# Altium PCB RC_Wheelchair.PcbDoc (part 1 of 2)
Units mil, origin at the board's own origin, x right, y up, seen from the top; angles counter-clockwise.
Board outline 6000 x 4000 mil, 2 copper layers (Top Layer, Bottom Layer); 99 components, 129 nets, 398 pads, 0 vias.
Unrouted connection lines stored in the file: 229.
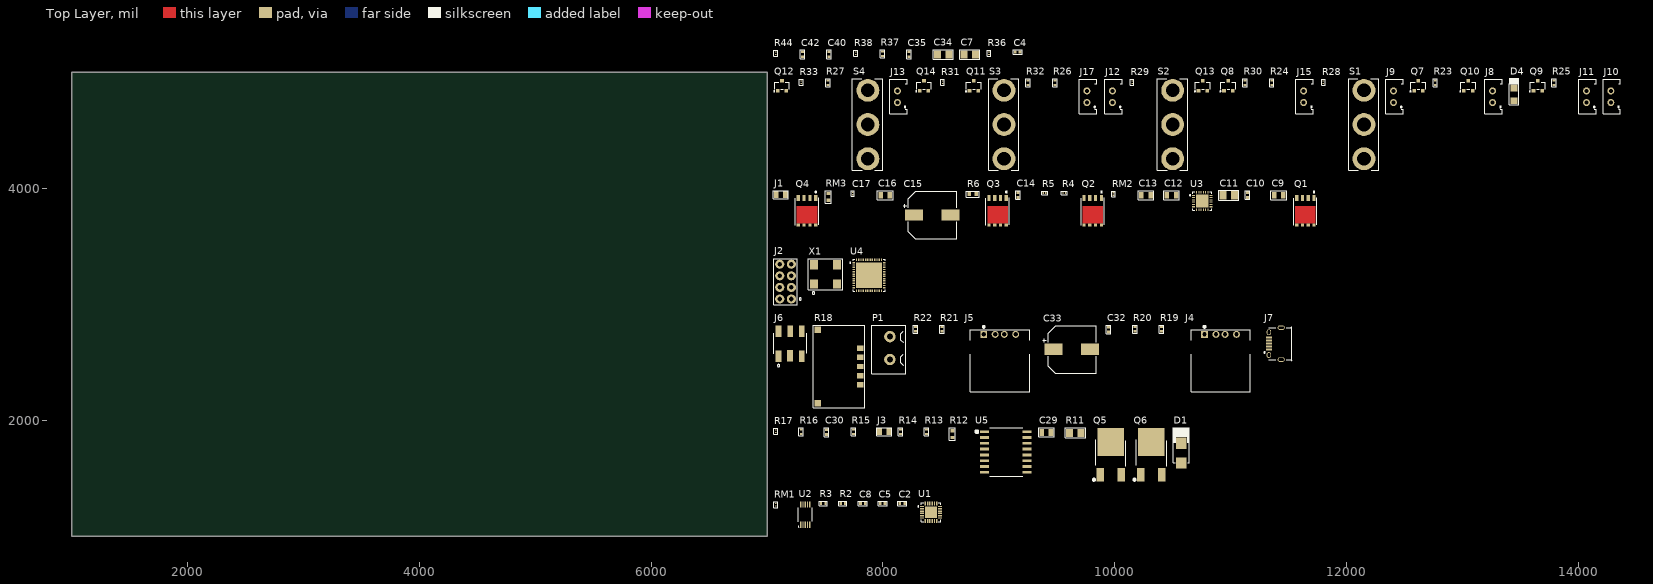
[diagram p0: Top Layer view]
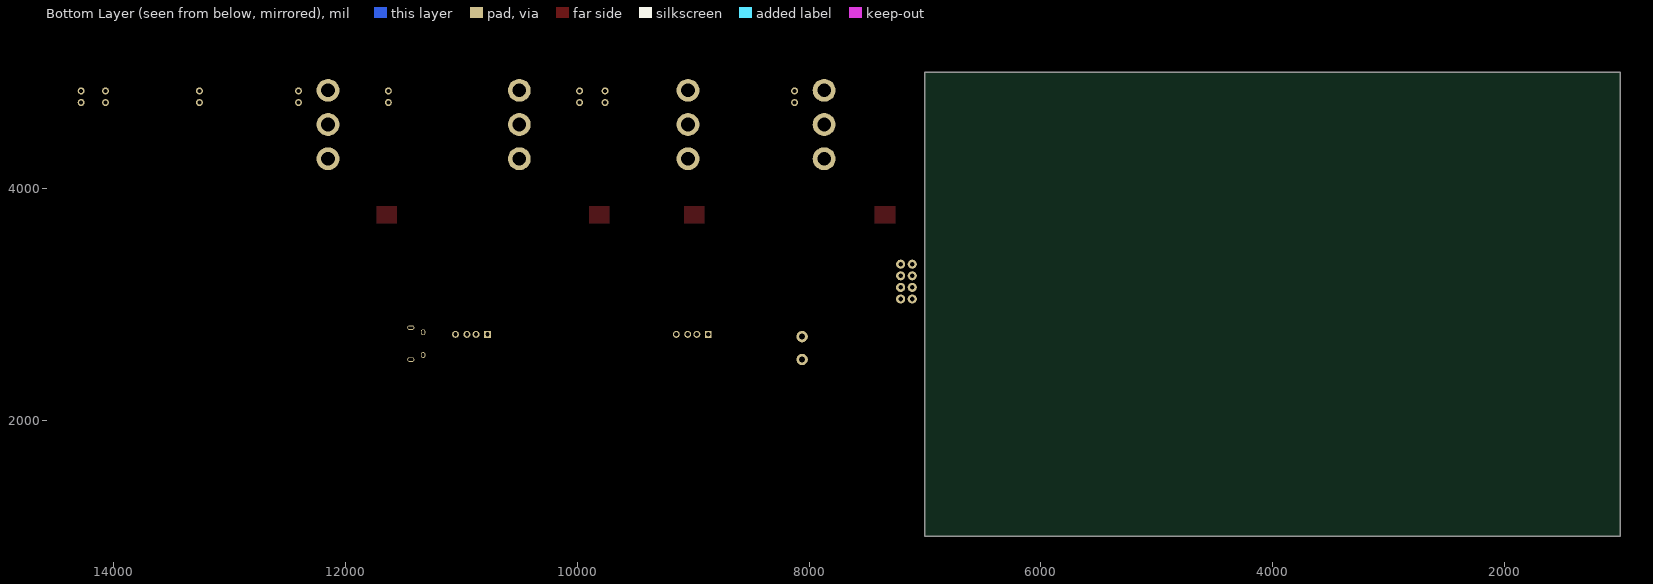
[diagram p1: Bottom Layer view, seen from below]

## Layer stack, top to bottom
Top Solder: solder mask 0.4, Solder Resist, Dk 3.5
Top Layer: signal copper 1.4
Dielectric 1: dielectric 12.6, FR-4, Dk 4.8
Bottom Layer: signal copper 1.4
Bottom Solder: solder mask 0.4, Solder Resist, Dk 3.5

## Board outline
1000,1000 7000,1000 7000,5000 1000,5000

## Design rules (kind name [scope] priority, off if disabled: settings)
Clearance [All] p1: gap=10 ignorepadtopadclearanceinfootprint=FALSE except(0: Arc-Hole Track-Hole SMDPad-Hole THPad-Hole Via-Hole Fill-Hole Poly-Hole Region-Hole Text-Hole)
PolygonConnect [All] p1: connectstyle=Relief reliefconductorwidth=10 reliefentries=4 polygonreliefangle="90 Angle" airgapwidth=10
RoomDefinition U_Power_Section [InComponentClass('U_Power_Section')] p1: confinementstyle=ConfineIn formatcopy=TRUE lockcomponents=FALSE outline 7045,5105 9250,5105 9250,5305 7045,5305
RoomDefinition U_Peripherals_Section [InComponentClass('U_Peripherals_Section')] p2: confinementstyle=ConfineIn formatcopy=TRUE lockcomponents=FALSE outline 7045,4140 14385,4140 14385,5055 7045,5055
RoomDefinition U_Drive_Motor_Section [InComponentClass('U_Drive_Motor_Section')] p3: confinementstyle=ConfineIn formatcopy=TRUE lockcomponents=FALSE outline 7045,3555 11755,3555 11755,4090 7045,4090
RoomDefinition "U_Controller Section" [InComponentClass('U_Controller Section')] p4: confinementstyle=ConfineIn formatcopy=TRUE lockcomponents=FALSE outline 7045,2985 8035,2985 8035,3505 7045,3505
RoomDefinition U_Connector_Section [InComponentClass('U_Connector_Section')] p5: confinementstyle=ConfineIn formatcopy=TRUE lockcomponents=FALSE outline 7045,2095 11550,2095 11550,2930 7045,2930
RoomDefinition "U_Charging Section" [InComponentClass('U_Charging Section')] p6: confinementstyle=ConfineIn formatcopy=TRUE lockcomponents=FALSE outline 7045,1460 10655,1460 10655,2045 7045,2045
RoomDefinition U_Camera_Interface [InComponentClass('U_Camera_Interface')] p7: confinementstyle=ConfineIn formatcopy=TRUE lockcomponents=FALSE outline 7045,1060 8520,1060 8520,1410 7045,1410
RoutingVias [All] p1: holewidth=28 width=50 viastyle="Through Hole" minholewidth=28 minwidth=50 maxholewidth=28 maxwidth=50
SolderMaskExpansion [All] p1: expansion=4 istentingtop=FALSE
Width [All] p1: maxlimit=10 minlimit=10 preferedwidth=10
30 further rules are at their usual default settings.

## Classes and differential pairs
component class U_Power_Section: C4 C7 C34 C35 C36 C37 C38 C39 C40 C41 C42 L1 L2 R34 R35 R36 R37 R38 R39 R40 R41 R42 R43 R44 U6 U7 U8
component class U_Peripherals_Section: D4 J8 J9 J10 J11 J12 J13 J14 J15 J16 J17 J18 J19 Q7 Q8 Q9 Q10 Q11 Q12 Q13 Q14 R23 R24 R25 R26 R27 R28 R29 R30 R31 R32 R33 S1 S2 S3 S4
component class U_Drive_Motor_Section: C9 C10 C11 C12 C13 C14 C15 C16 C17 J1 Q1 Q2 Q3 Q4 R4 R5 R6 RM2 RM3 U3
component class "U_Controller Section": C18 C19 C20 C21 C22 C23 C24 C25 C26 C27 C28 J2 LED1 R7 R8 R9 R10 SW1 SW2 U4 X1
component class U_Connector_Section: C31 C32 C33 D2 D3 J4 J5 J6 J7 P1 R18 R19 R20 R21 R22 RF1 RF2
component class "U_Charging Section": C29 C30 D1 J3 Q5 Q6 R11 R12 R13 R14 R15 R16 R17 U5
component class U_Camera_Interface: C1 C2 C3 C5 C6 C8 R1 R2 R3 RM1 U1 U2

## Components (designator, comment, footprint, x,y, rotation, side; value= is the part's Value field where it differs from the comment)
C2 "0.1uF" "CAP 0402" 8145,1280 r0 top
C4 "0.1uF" "CAP 0402" 9140,5175 r0 top
C5 "0.1uF" "CAP 0402" 7975,1280 r0 top
C7 "10uF" Cap1206 8750,5155 r0 top
C8 "0.1uF" "CAP 0402" 7805,1280 r0 top
C9 "1UF" Cap0805 11415,3940 r0 top
C10 "0.1uF" "CAP 0402" 11145,3920 r90 top
C11 "10UF" Cap1206 10985,3940 r0 top
C12 "1UF" Cap0805 10490,3940 r0 top
C13 "1UF" Cap0805 10270,3940 r0 top
C14 "0.1uF" "CAP 0402" 9165,3920 r90 top
C15 "470µF" UCD1V471MNL6GS 8425,3770 r0 top
C16 "1UF" Cap0805 8020,3940 r0 top
C17 "1nF" "CAP 0201" 7740,3955 r90 top
C29 "1UF" Cap0805 9410,1895 r0 top
C30 "0.1UF" "CAP 0402" 7515,1875 r90 top
C32 "0.1uF" "CAP 0402" 9945,2760 r90 top
C33 "470µF" UCD1V471MNL6GS 9630,2610 r0 top
C34 "10uF" Cap1206 8520,5155 r0 top
C35 "0.1uF" "CAP 0402" 8225,5135 r90 top
C40 "0.1uF" "CAP 0402" 7535,5135 r90 top
C42 "0.1uF" "CAP 0402" 7305,5135 r90 top
D1 "ES3AB-13-F" ES3AB-13-F 10575,1715 r90 top
D4 "PMEG3010ER,115" SOD-123W 13445,4810 r90 top
J1 "SMD PADS" "SMD PAD" 7120,3945 r0 top
J2 "MTF185-204SY1" MTF185-204SY1 7210,3045 r90 top
J3 "SMD PADS" "SMD PAD" 8010,1900 r0 top
J4 "292303-1" 292303-1 10775,2740 r0 top
J5 "292303-1" 292303-1 8870,2740 r0 top
J6 "95278-101A06LF" 95278-101A06LF 7200,2660 r0 top
J7 "10118194-0001LF" 10118194-0001LF 11330,2660 r90 top
J8 "B2B-EH-A(LF)(SN)" B2B-EH-A(LF)(SN) 13260,4790 r90 top
J9 "B2B-EH-A(LF)(SN)" B2B-EH-A(LF)(SN) 12405,4790 r90 top
J10 "B2B-EH-A(LF)(SN)" B2B-EH-A(LF)(SN) 14280,4790 r90 top
J11 "B2B-EH-A(LF)(SN)" B2B-EH-A(LF)(SN) 14070,4790 r90 top
J12 "B2B-EH-A(LF)(SN)" B2B-EH-A(LF)(SN) 9980,4790 r90 top
J13 "B2B-EH-A(LF)(SN)" B2B-EH-A(LF)(SN) 8125,4790 r90 top
J15 "B2B-EH-A(LF)(SN)" B2B-EH-A(LF)(SN) 11630,4790 r90 top
J17 "B2B-EH-A(LF)(SN)" B2B-EH-A(LF)(SN) 9760,4790 r90 top
P1 "WJ301V-5.0-2P" WJ301V-5.0-2P 8060,2720 r90 top value=Custom
Q1 "CSD18540Q5B" 8-VSON-CLIP 11645,3800 r90 top
Q2 "CSD18540Q5B" 8-VSON-CLIP 9810,3800 r90 top
Q3 "CSD18540Q5B" 8-VSON-CLIP 8990,3800 r90 top
Q4 "CSD18540Q5B" 8-VSON-CLIP 7345,3800 r90 top
Q5 "MJD32CT4G" DPAK 9965,1670 r0 top
Q6 "MJD31CT4G" DPAK 10315,1670 r0 top
Q7 "DMP6350S-7" SOT23-3 12620,4885 r0 top
Q8 "DMP6350S-7" SOT23-3 10980,4885 r0 top
Q9 "DMP6350S-7" SOT23-3 13650,4885 r0 top
Q10 "DMP6350S-7" SOT23-3 13050,4885 r0 top
Q11 "DMP6350S-7" SOT23-3 8785,4885 r0 top
Q12 "DMP6350S-7" SOT23-3 7130,4885 r0 top
Q13 "DMP6350S-7" SOT23-3 10760,4885 r0 top
Q14 "DMP6350S-7" SOT23-3 8355,4885 r0 top
R2 "22.6K" Res0402 7655,1280 r0 top
R3 "47K" Res0402 7485,1280 r0 top
R4 "10K" Res-0201 9565,3960 r0 top
R5 "10K" Res-0201 9395,3960 r0 top
R6 "68K" Res0603 8775,3950 r0 top
R11 "0.082R" Res1206 9660,1890 r0 top
R12 "162K" Res0603 8600,1880 r90 top
R13 "16.9K" Res0402 8375,1900 r90 top
R14 "46.4K" Res0402 8150,1900 r90 top
R15 "475K" Res0402 7745,1900 r90 top
R16 "442R" Res0402 7295,1900 r90 top
R17 "10K" Res-0201 7075,1905 r90 top
R18 "10K" RK14J11R000J 7805,2305 r90 top
R19 "0R" Res0402 10405,2785 r90 top
R20 "0R" Res0402 10175,2785 r90 top
R21 "0R" Res0402 8510,2785 r90 top
R22 "0R" Res0402 8280,2785 r90 top
R23 "68R" Res0402 12765,4910 r90 top
R24 "68R" Res0402 11355,4910 r90 top
R25 "48.7R" Res0402 13790,4910 r90 top
R26 "68R" Res0402 9485,4910 r90 top
R27 "68R" Res0402 7525,4910 r90 top
R28 "10K" Res-0201 11800,4915 r90 top
R29 "10K" Res-0201 10150,4915 r90 top
R30 "240R" Res0402 11125,4910 r90 top
R31 "10K" Res-0201 8515,4915 r90 top
R32 "240R" Res0402 9250,4910 r90 top
R33 "10K" Res-0201 7295,4915 r90 top
R36 "10K" Res-0201 8915,5165 r90 top
R37 "47K" Res0402 7995,5160 r90 top
R38 "10K" Res-0201 7765,5165 r90 top
R44 "10K" Res-0201 7075,5165 r90 top
RM1 "10K" Res-0201 7075,1270 r90 top
RM2 "10K" Res-0201 9990,3950 r90 top
RM3 "0.01R" Res0603 7530,3925 r90 top
S1 "DC1C-A1AA" DC1C-A1AA 12150,4550 r90 top
S2 "DC1C-A1AA" DC1C-A1AA 10500,4550 r90 top
S3 "DC1C-A1AA" DC1C-A1AA 9045,4550 r90 top
S4 "DC1C-A1AA" DC1C-A1AA 7870,4550 r90 top
U1 "CP2102N-A02-GQFN24R" "24-QFN (4x4)" 8415,1205 r0 top
U2 "FSUSB30MUX" 10-MSOP 7330,1185 r90 top
U3 "DRV8701ERGET" DRV8701ERGET 10755,3890 r0 top
U4 "STM32F401CCU6" 48-UFQFPN 7880,3250 r0 top
U5 "BQ24450DWTR" 16-SOIC 9060,1725 r0 top
X1 "X1G004481000200" X1G004481000200 7405,3175 r0 top

## Footprints (in the part's own frame and the unit in brackets; to place one, negate y for a bottom-side part, rotate by r counter-clockwise, add the part's x,y. Pads: shape width x height; smd on the part's side, far side on the other; paste and mask are expansions set on the pad)
8-VSON-CLIP [mm] "MOSFET N-CH 60V 100A 8VSON"
  rect 1.372x0.71 smd: 1(2.966,-1.905) 2(2.966,-0.635) 3(2.966,0.635) 4(2.966,1.905) 4(2.966,1.905) 4(2.966,1.905) 4(2.966,1.905)
  rect 0.59x0.71 smd: 5(-2.965,1.905) 6(-2.965,0.635) 7(-2.965,-0.635) 8(-2.965,-1.905)
  Top Layer region: -2.666,-2.262 1.182,-2.262 1.182,2.261 -2.666,2.261
  silkscreen extent -2.97,-2.54 4.46,2.56, body extent -3,-2.5 3,2.5, height 1.05
10-MSOP [mm] "IC USB SWITCH 2X2 10MSOP"
  rect 1.4x0.3 smd: 1(-2.2,1) 2(-2.2,0.5) 3(-2.2,0) 4(-2.2,-0.5) 5(-2.2,-1) 6(2.2,-1) 7(2.2,-0.5) 8(2.2,0) 9(2.2,0.5) 10(2.2,1)
  silkscreen extent -2.72,-1.55 1.52,1.55, body extent -2.45,-1.5 2.45,1.5, height 1.25
16-SOIC [mm] "IC BATTERY CHARGER CTRLR 16-SOIC"
  rect 2x0.6 smd: 1(-4.65,4.445) 2(-4.65,3.175) 3(-4.65,1.905) 4(-4.65,0.635) 5(-4.65,-0.635) 6(-4.65,-1.905) 7(-4.65,-3.175) 8(-4.65,-4.445) 9(4.65,-4.445) 10(4.65,-3.175) 11(4.65,-1.905) 12(4.65,-0.635) 13(4.65,0.635) 14(4.65,1.905) 15(4.65,3.175) 16(4.65,4.445)
  silkscreen extent -6.63,-5.33 3.75,5.33, body extent -5.32,-5.24 5.32,5.25, height 2.64
"24-QFN (4x4)" [mm]
  rect 0.85x0.3 smd: 1(-1.95,1.25) 2(-1.95,0.75) 3(-1.95,0.25) 4(-1.95,-0.25) 5(-1.95,-0.75) 6(-1.95,-1.25) 13(1.95,-1.25) 14(1.95,-0.75) 15(1.95,-0.25) 16(1.95,0.25) 17(1.95,0.75) 18(1.95,1.25)
  rect 0.3x0.85 smd: 7(-1.25,-1.95) 8(-0.75,-1.95) 9(-0.25,-1.95) 10(0.25,-1.95) 11(0.75,-1.95) 12(1.25,-1.95) 19(1.25,1.95) 20(0.75,1.95) 21(0.25,1.95) 22(-0.25,1.95) 23(-0.75,1.95) 24(-1.25,1.95)
  rect 2.55x2.55 smd: 25(0,0)
  silkscreen extent -2.92,-2.11 2.11,2.11, body extent -2.01,-2.01 2.01,2.01, height 0.9
48-UFQFPN [mm] "IC MCU 32BIT 256KB FLASH 48QFPN"
  rect 0.55x0.3 smd: 1(-3.35,2.75) 1(-3.35,2.75) 2(-3.35,2.25) 3(-3.35,1.75) 4(-3.35,1.25) 5(-3.35,0.75) 6(-3.35,0.25) 7(-3.35,-0.25) 8(-3.35,-0.75) 9(-3.35,-1.25) 10(-3.35,-1.75) 11(-3.35,-2.25) 12(-3.35,-2.75) 25(3.35,-2.75) 26(3.35,-2.25) 27(3.35,-1.75) 28(3.35,-1.25) 29(3.35,-0.75) 30(3.35,-0.25) 31(3.35,0.25) 32(3.35,0.75) 33(3.35,1.25) 34(3.35,1.75) 35(3.35,2.25) 36(3.35,2.75)
  rect 0.3x0.55 smd: 13(-2.75,-3.35) 14(-2.25,-3.35) 15(-1.75,-3.35) 16(-1.25,-3.35) 17(-0.75,-3.35) 18(-0.25,-3.35) 19(0.25,-3.35) 20(0.75,-3.35) 21(1.25,-3.35) 22(1.75,-3.35) 23(2.25,-3.35) 24(2.75,-3.35) 37(2.75,3.35) 38(2.25,3.35) 39(1.75,3.35) 40(1.25,3.35) 41(0.75,3.35) 42(0.25,3.35) 43(-0.25,3.35) 44(-0.75,3.35) 45(-1.25,3.35) 46(-1.75,3.35) 47(-2.25,3.35) 48(-2.75,3.35)
  rect 5.6x5.6 smd: 49(0,0)
  silkscreen extent -4.2,-3.53 3.51,3.53, body extent -3.5,-3.5 3.5,3.5, height 0.55
95278-101A06LF [mm] "CONN HEADER SMD 6POS 2.54MM"
  rect 1.27x2.54 smd: 1(-2.54,-2.73) 2(-2.54,2.73) 3(-0.025,-2.692) 4(0,2.73) 5(2.54,-2.73) 6(2.54,2.73)
  silkscreen extent -3.56,-5.08 3.66,2.29, body extent -3.58,-3.63 3.64,3.67, height 9.72
292303-1 [mm] "USB-A (USB TYPE-A) USB 2.0 Receptacle Connector 4 Position Through Hole, Right Angle"
  rect 1.524x1.524 hole 0.92: 1(0,0)
  round 1.524 hole 0.92: 2(2.5,0) 3(4.5,0) 4(7,0)
  round 0 hole 2.3 unplated: MH1(-3.07,-2.71) MH2(10.07,-2.71)
  silkscreen extent -2.92,-12.57 10.03,1.83, body extent -4.44,-13.02 11.56,0.98, height 7.71
10118194-0001LF [mm]
  rect 0.42x1.35 smd: 1(-1.3,0) 2(-0.65,0) 3(0,0) 4(0.65,0) 5(1.3,0)
  oval 1.25x1 hole 0.55 slot 0.85 at 0 deg: MH1(-2.5,0) MH2(2.5,0)
  oval 1x1.55 hole 0.5 slot 1.15 at 90 deg: MH3(-3.5,-2.7) MH4(3.5,-2.7)
  silkscreen extent -3.73,-5 3.72,1.1, body extent -7.67,-5.38 4.02,0.2, height 2.72
B2B-EH-A(LF)(SN) [mil]
  round 60 hole 35.43: 1(-50,0) 2(50,0)
  silkscreen extent -148,-83 151,67, body extent -148,-86 148,64, height 244
Cap0805 [mil] "SMD 0805"
  rect 40x60 smd: 1(-40,0) 2(40,0)
  silkscreen extent -67,-37 67,37, body extent -39,-25 39,25, height 30
Cap1206 [mil] "SMD 1206"
  rect 60x70 smd: 1(-50,0) 2(50,0)
  silkscreen extent -87,-42 87,42, body extent -63,-31 63,32, height 39
"CAP 0201" [mm]
  rect 0.3x0.3 smd: 1(-0.3,0) 2(0.3,0)
  silkscreen extent -0.6,-0.3 0.61,0.3, body extent -0.3,-0.15 0.3,0.15, height 0.28
"CAP 0402" [mm] "CC0402JRNPO9BN330"
  rect 0.6x0.7 smd: 1(0.025,0) 2(1.085,0)
  silkscreen extent -0.42,-0.5 1.54,0.48, body extent -0.01,-0.29 1.11,0.32, height 0.56
DC1C-A1AA [mm]
  round 5 hole 3: 1(-7.5,0) 2(0,0) 3(7.5,0)
  silkscreen extent -10.06,-3.28 9.98,3.38, body extent -9.95,-3.17 9.9,3.28, height 12.01
DPAK [mm] "TRANS PNP 100V 3A DPAK"
  rect 1.6x3 smd: 1(-2.285,-3.59) 3(2.285,-3.59)
  rect 5.8x6.2 smd: 2_4(0.007,3.59)
  silkscreen extent -3.86,-4.88 3.35,4.06, body extent -3.27,-4.29 3.27,5.65, height 2.39
DRV8701ERGET [mm] "Motor Driver Power MOSFET Parallel 24-VQFN (4x4)"
  rect 0.6x0.24 smd: 1(-1.9,1.25) 2(-1.9,0.75) 3(-1.9,0.25) 4(-1.9,-0.25) 5(-1.9,-0.75) 6(-1.9,-1.25) 13(1.9,-1.25) 14(1.9,-0.75) 15(1.9,-0.25) 16(1.9,0.25) 17(1.9,0.75) 18(1.9,1.25)
  rect 0.24x0.6 smd: 7(-1.25,-1.9) 8(-0.75,-1.9) 9(-0.25,-1.9) 10(0.25,-1.9) 11(0.75,-1.9) 12(1.25,-1.9) 19(1.25,1.9) 20(0.75,1.9) 21(0.25,1.9) 22(-0.25,1.9) 23(-0.75,1.9) 24(-1.25,1.9)
  rect 2.8x2.8 smd: 25(0,0)
  silkscreen extent -2.79,-2.03 2.03,2.03, body extent -2,-2 2,2, height 0.9
ES3AB-13-F [mm] "DIODE GEN PURP 50V 3A SMB"
  rect 2.5x2.3 smd: 1(-2.15,0) 2(2.15,0)
  silkscreen extent -2.11,-1.78 5.59,1.78, body extent -2.7,-1.8 2.7,1.8, height 2.3
MTF185-204SY1 [mm] "Female Header Female Socket 0.100\"(2.54mm) 8 2 Through Hole"
  round 2 hole 1.02: 1(0,0) 2(0,2.54) 3(2.54,0) 4(2.54,2.54) 5(5.08,0) 6(5.08,2.54) 7(7.62,0) 8(7.62,2.54)
  silkscreen extent -1.27,-2.22 8.86,3.84
Res0402 [mil]
  rect 18x25 smd: 1(-18.5,0) 2(18.5,0)
  silkscreen extent -34,-19 34,19, body extent -23,-11 23,11, height 16
Res0603 [mil]
  rect 30x35 smd: 1(30,0) 2(-30,0)
  silkscreen extent -54,-26 54,26, body extent -31,-17 31,17, height 18
Res1206 [mil]
  rect 60x70 smd: 1(-50,0) 2(50,0)
  silkscreen extent -88,-43 88,43, body extent -63,-31 63,32, height 39
Res-0201 [mm]
  rect 0.27x0.37 smd: 1(-0.275,0) 2(0.275,0)
  silkscreen extent -0.64,-0.41 0.64,0.41, body extent -0.3,-0.15 0.3,0.15, height 0.29
RK14J11R000J [mm] "10K ±30% SMD Potentiometers & Variable Resistors RoHS"
  rect 1.2x1.4 smd: 1(0,0) 2(6,0) 3(2,0) D1(4,0) D2(8,0)
  rect 0x0 hole 1 square unplated: MH1(-2.8,7.5) MH2(10,7.5)
  rect 1.5x1.4 smd: MP1(-4.05,9.3) MP2(12.05,9.3)
  silkscreen extent -5.05,-0.97 13.06,10.26
"SMD PAD" [mil] "SMD 0805"
  rect 40x60 smd: 1(-40,0) 2(40,0)
  silkscreen extent -65,-35 65,35
SOD-123W [mm] "DIODE SCHOTTKY 30V 1A SOD123W"
  rect 1.5x1.5 smd: 1(-1.4,0) 2(1.4,0)
  silkscreen extent -2.31,-1.09 3.55,1.09, body extent -2,-0.95 2,0.95, height 1.1
SOT23-3 [mm] "SOT23, 3-Leads, Body 2.9x1.3mm, Pitch 0.95mm, Lead Span 2.3mm - Reverse Pinning, IPC High Density"
  rect 0.8x0.8 smd: 1(-0.95,-1.075) 2(0.95,-1.075) 3(0,1.075)
  silkscreen extent -1.85,-1.37 1.63,0.81, body extent -1.5,-1.25 1.5,1.25, height 1.05
UCD1V471MNL6GS [mm] "470µF 35V Aluminum Electrolytic Capacitors Radial, Can - SMD  5000 Hrs @ 105°C"
  rect 4x2.5 smd: 1(-4,0) 2(4,0)
  silkscreen extent -6.38,-5.21 5.33,5.21, body extent -5.65,-5.16 5.65,5.16, height 14.05
WJ301V-5.0-2P [mm]
  round 2.5 hole 1.3: 1(-5,0) 2(0,0)
  silkscreen extent -8.07,-3.5 2.5,3.99, body extent -8.1,-3.5 2.5,4, height 10
X1G004481000200 [mm] "24MHz ±100ppm 1.6V ~ 3.6V 3mA SMD-7050_4P SMD Oscillators(XO) RoHS"
  rect 1.8x2 smd: 1(0,0) 2(5.08,0) 3(5.08,4.2) 4(0,4.2)
  silkscreen extent -1.24,-2.3 6.35,5.49

## Part data
C2 C5 C8 C10 C14 C32: library part CC0402KRX7R7BB104, "CAP CER 0.1UF 16V X7R 0402", Capacitance=100nF, Case/Package=0402, Case Code (Metric)=1005, Dielectric=X7R, Manufacturer=Yageo, Max Operating Temperature=125°C, Min Operating Temperature=-55°C, Package Quantity=1, Supplier Part Number 1=311-1338-1-ND, Tolerance=10%, Voltage=16V, Case Code (Imperial)=0402, ComponentLink1Description=http://www.yageo.com/documents/recent/UPY-GPHC_X7R_6.3V-to-50V_8.pdf?src-supplier=Avnet+Europe, ComponentLink1URL=http://www.yageo.com/documents/recent/UPY-GPHC_X7R_6.3V-to-50V_8.pdf?src-supplier=Avnet+Europe, ComponentLink2Description=http://www.yageo.com/documents/recent/UPY-GPHC_X7R_6.3V-to-50V_18.pdf?src-supplier=Digi-Key, ComponentLink2URL=http://www.yageo.com/documents/recent/UPY-GPHC_X7R_6.3V-to-50V_18.pdf?src-supplier=Digi-Key, ComponentLink3Description=http://www.yageo.com/documents/recent/UPY-GPHC_X7R_6.3V-to-50V_8.pdf?src-supplier=Avnet, ComponentLink3URL=http://www.yageo.com/documents/recent/UPY-GPHC_X7R_6.3V-to-50V_8.pdf?src-supplier=Avnet, ComponentLink4Description=http://www.yageo.com/documents/recent/UPY-GPHC_X7R_6.3V-to-50V_18.pdf?src-supplier=Mouser, ComponentLink4URL=http://www.yageo.com/documents/recent/UPY-GPHC_X7R_6.3V-to-50V_18.pdf?src-supplier=Mouser, ComponentLink5Description=http://www.farnell.com/datasheets/2167236.pdf?src-supplier=Element14, ComponentLink5URL=http://www.farnell.com/datasheets/2167236.pdf?src-supplier=Element14, ComponentLink6Description=http://www.farnell.com/datasheets/1489800.pdf?src-supplier=Element14, ComponentLink6URL=http://www.farnell.com/datasheets/1489800.pdf?src-supplier=Element14, Composition=Ceramic, Depth=0.5mm, Halogen Free="Halogen Free", Height=0.5mm, Lead Free="Lead Free", Length=1mm, Manufacturer Part Number=CC0402KRX7R7BB104, Mount="Surface Mount", Number of Pins=2, Packaging="Tape and Reel", Pricing 1="1=0.1, 10=0.034, 100=0.015, 500=0.0107, 1000=0.00841, 2500=0.00764, 5000=0.00703 (USD)", Radiation Hardening=No, REACH SVHC="No SVHC", Stock 1=9987374, Supplier 1=Digi-Key, Termination=SMD/SMT, Thickness=0.022inch, Voltage Rating=16V, Voltage Rating (DC)=16V, Width=0.02inch
C4 C35 C40 C42: library part CL05B104KB54PNC, "CAP CER 0.1UF 50V X7R 0402", Manufacturer=Samsung, Supplier Part Number 1=1276-CL05B104KB54PNCDKR-ND, Manufacturer Part Number=CL05B104KB54PNC, Pricing 1="1=0.1, 10=0.067, 50=0.0366, 100=0.0299, 500=0.02138, 1000=0.01681, 2500=0.01528, 5000=0.01406 (USD)", Stock 1=8594, Supplier 1=Digi-Key
C7 C34: library part CL31B106KBHNNNE, "CAP CER 10UF 50V X7R 1206", Case/Package=1206, Case Code (Metric)=3216, Dielectric=X7R, Manufacturer=Samsung, Max Operating Temperature=125°C, Min Operating Temperature=-55°C, Supplier Part Number 1=1276-6767-1-ND, Tolerance=10%, Voltage Rating=50V, Capacitance=10uF, Case Code (Imperial)=1206, ComponentLink1Description=http://www.samsungsem.com/kr/support/product-search/mlcc/CL31B106KBHNNNE.jsp?src-supplier=Digi-Key, ComponentLink1URL=http://www.samsungsem.com/kr/support/product-search/mlcc/CL31B106KBHNNNE.jsp?src-supplier=Digi-Key, Lead Free="Lead Free", Length=0.126inch, Manufacturer Part Number=CL31B106KBHNNNE, Mount="Surface Mount", Packaging="Tape and Reel", Pricing 1="1=0.39, 10=0.268, 50=0.1872, 100=0.1605, 500=0.12038, 1000=0.10166 (USD)", Stock 1=177239, Supplier 1=Digi-Key, Thickness=0.071inch, Voltage Rating (DC)=50V, Width=0.063inch
C9 C12 C13 C16 C29: library part CL21B105KBFNNNE, "CAP CER 1UF 50V X7R 0805", Capacitance=1uF, Case/Package=0805, Case Code (Metric)=2012, Dielectric=X7R, Manufacturer=Samsung, Max Operating Temperature=125°C, Min Operating Temperature=-55°C, Package Quantity=1, Supplier Part Number 1=1276-1029-1-ND, Tolerance=10%, Voltage=50V, Case Code (Imperial)=0805, ComponentLink1Description=http://www.samsungsem.com/kr/support/product-search/mlcc/CL21B105KBFNNNE.jsp?src-supplier=Digi-Key, ComponentLink1URL=http://www.samsungsem.com/kr/support/product-search/mlcc/CL21B105KBFNNNE.jsp?src-supplier=Digi-Key, ComponentLink2Description=http://www1.futureelectronics.com/doc/SAMSUNG/CL21B105KBFNNNE.pdf?src-supplier=Future+Electronics, ComponentLink2URL=http://www1.futureelectronics.com/doc/SAMSUNG/CL21B105KBFNNNE.pdf?src-supplier=Future+Electronics, ComponentLink3Description=https://www.verical.com/server-webapp/html/getDatasheet?partID=354075&src-supplier=Verical, ComponentLink3URL=https://www.verical.com/server-webapp/html/getDatasheet?partID=354075&src-supplier=Verical, Depth=1.25mm, Height=1.25mm, Length=2mm, Manufacturer Part Number=CL21B105KBFNNNE, Mount="Surface Mount", Packaging="Tape and Reel", Pricing 1="1=0.13, 10=0.093, 50=0.053, 100=0.0439, 500=0.03076, 1000=0.02547 (USD)", Radiation Hardening=No, Stock 1=550461, Supplier 1=Digi-Key, Thickness=0.053inch, Voltage Rating=50V, Width=0.049inch
C11: library part CL31B106KBHNNNE, "CAP CER 10UF 50V X7R 1206", Capacitance=10uF, Case/Package=1206, Case Code (Metric)=3216, Dielectric=X7R, Manufacturer=Samsung, Max Operating Temperature=125°C, Min Operating Temperature=-55°C, Supplier Part Number 1=1276-6767-1-ND, Tolerance=10%, Voltage Rating=50V, Case Code (Imperial)=1206, ComponentLink1Description=http://www.samsungsem.com/kr/support/product-search/mlcc/CL31B106KBHNNNE.jsp?src-supplier=Digi-Key, ComponentLink1URL=http://www.samsungsem.com/kr/support/product-search/mlcc/CL31B106KBHNNNE.jsp?src-supplier=Digi-Key, Lead Free="Lead Free", Length=0.126inch, Manufacturer Part Number=CL31B106KBHNNNE, Mount="Surface Mount", Packaging="Tape and Reel", Pricing 1="1=0.39, 10=0.268, 50=0.1872, 100=0.1605, 500=0.12038, 1000=0.10166 (USD)", Stock 1=177239, Supplier 1=Digi-Key, Thickness=0.071inch, Voltage Rating (DC)=50V, Width=0.063inch
C15 C33: library part UCD1V471MNL6GS, "470µF 35V Aluminum Electrolytic Capacitors Radial, Can - SMD", Capacitance=470uF, Case/Package=Aluminum, Leakage Current=3uA, Manufacturer=Nichicon, Max Operating Temperature=105°C, Min Operating Temperature=-55°C, Package Quantity=400, Ripple Current=950mA, Supplier Part Number 1=493-14715-6-ND, Tolerance=20%, Voltage Rating (DC)=35V, ComponentLink1Description=http://www.mouser.com/ds/2/293/e-ucd-883803.pdf?src-supplier=Mouser, ComponentLink1URL=http://www.mouser.com/ds/2/293/e-ucd-883803.pdf?src-supplier=Mouser, ComponentLink2Description=http://nichicon-us.com/english/products/pdfs/e-ucd.pdf?src-supplier=Digi-Key, ComponentLink2URL=http://nichicon-us.com/english/products/pdfs/e-ucd.pdf?src-supplier=Digi-Key, Length=13.5mm, Manufacturer Part Number=UCD1V471MNL6GS, Packaging="Tape and Reel", Pricing 1="1=1.04, 10=0.789, 50=0.6556, 100=0.5646 (USD)", Stock 1=2530, Supplier 1=Digi-Key, Termination=SMD/SMT
C17: library part 0201B102K160CT, "CAP CER 1000PF 16V X7R 0201", Case/Package=0201, Case Code (Metric)=0603, Dielectric=X7R, Manufacturer="Walsin Technologies", Max Operating Temperature=125°C, Min Operating Temperature=-55°C, Supplier Part Number 1=1292-1117-6-ND, Tolerance=10%, Voltage Rating=16V, Capacitance=1nF, Case Code (Imperial)=0201, Manufacturer Part Number=0201B102K160CT, Packaging="Cut Tape", Pricing 1="1=0.1, 10=0.015, 50=0.0084, 100=0.0068, 500=0.00488, 1000=0.00384, 2500=0.00349, 5000=0.00321 (USD)", REACH SVHC=Unknown, Stock 1=360567, Supplier 1=Digi-Key, Voltage Rating (DC)=16V
C30: library part C0402C104Z4VAC7867, "0.1µF -20%, +80% 16V Ceramic Capacitor Y5V (F) 0402 (1005 Metric)", Capacitance=100nF, Case/Package=0402, Dielectric=Y5V, Dielectric Material=Ceramic, Manufacturer=KEMET, Manufacturer Part Number=C0402C104Z4VACTU, Max Operating Temperature=85°C, Min Operating Temperature=-30°C, Supplier Part Number 1=399-1043-6-ND, Tolerance=80%, Voltage Rating (DC)=16V, ComponentLink1Description=https://www.verical.com/server-webapp/html/getDatasheet?partID=764272&src-supplier=Verical, ComponentLink1URL=https://www.verical.com/server-webapp/html/getDatasheet?partID=764272&src-supplier=Verical, Depth=0.5mm, Height=0.5mm, Lead Free="Lead Free", Length=1mm, Mount="Surface Mount", Packaging="Tape and Reel", Pricing 1="1=0.1, 10=0.018, 100=0.0081, 500=0.00578, 1000=0.00454, 2500=0.00412, 5000=0.0038 (USD)", Radiation Hardening=No, Stock 1=1342942, Supplier 1=Digi-Key
D1: "DIODE GEN PURP 50V 3A SMB", Average Rectified Current=3A, Capacitance=45pF, Case/Package=SMB, Forward Voltage=900mV, Manufacturer=Diodes, Max Operating Temperature=150°C, Max Repetitive Reverse Voltage (Vrrm)=50V, Max Surge Current=100A, Min Operating Temperature=-55°C, Package Quantity=3000, Peak Reverse Current=10uA, Supplier Part Number 1=ES3AB-FDIDKR-ND, ComponentLink1Description=http://www.diodes.com///datasheets/ds14003.pdf?src-supplier=Avnet+Europe, ComponentLink1URL=http://www.diodes.com///datasheets/ds14003.pdf?src-supplier=Avnet+Europe, ComponentLink2Description=http://www.diodes.com///datasheets/ds14003.pdf?src-supplier=Avnet, ComponentLink2URL=http://www.diodes.com///datasheets/ds14003.pdf?src-supplier=Avnet, ComponentLink3Description=https://www.verical.com/server-webapp/html/getDatasheet?partID=61156&src-supplier=Verical, ComponentLink3URL=https://www.verical.com/server-webapp/html/getDatasheet?partID=61156&src-supplier=Verical, ComponentLink4Description=http://www.diodes.com/_files/datasheets/ds14003.pdf?src-supplier=Future+Electronics, ComponentLink4URL=http://www.diodes.com/_files/datasheets/ds14003.pdf?src-supplier=Future+Electronics, Current Rating=3A, Element Configuration=Single, Forward Current=3A, Height=2.42mm, Lead Free="Lead Free", Length=4.57mm, Manufacturer Part Number=ES3AB-13-F, Max Reverse Voltage (DC)=50V, Mount="Surface Mount", Number of Pins=2, Output Current=3A, Packaging="Tape and Reel", Peak Non-Repetitive Surge Current=100A, Polarity=Standard, Pricing 1="1=0.62, 10=0.53, 25=0.4948, 100=0.3676, 250=0.34924, 500=0.28704, 1000=0.23331 (USD)", Radiation Hardening=No, Recovery Time=25ns, Reverse Recovery Time=25ns, Reverse Voltage (DC)=50V, Stock 1=36847, Supplier 1=Digi-Key, Termination=SMD/SMT, Voltage Rating (DC)=50V, Weight=0.00328oz, Width=3.94mm
D4: "DIODE SCHOTTKY 30V 1A SOD123W", Manufacturer=Nexperia, Supplier Part Number 1=1727-5201-1-ND, Manufacturer Part Number=PMEG3010ER,115, Pricing 1="1=0.35, 10=0.282, 25=0.258, 100=0.162, 250=0.1602, 500=0.15, 1000=0.102 (USD)", Stock 1=72983, Supplier 1=Digi-Key
J1 J3: library part "SMD PAD"
J2: "Female Header Female Socket 0.100\"(2.54mm) 8 2 Through Hole,P=2.54mm Pin Header & Female Header RoHS"
J4 J5: "USB-A (USB TYPE-A) USB 2.0 Receptacle Connector 4 Position Through Hole, Right Angle", Color=Black, Contact Current Rating=1A, Flammability Rating="UL94 V-0", Insulation Resistance=1GR, Manufacturer="TE Connectivity", Max Operating Temperature=185°C, Min Operating Temperature=-67°C, Package Quantity=30, Supplier Part Number 1=A31726-ND, Voltage Rating (AC)=30V, Approvals=UL, Circuit Application=Signal, ComponentLink1Description=http://www.farnell.com/datasheets/1699414.pdf?src-supplier=Farnell, ComponentLink1URL=http://www.farnell.com/datasheets/1699414.pdf?src-supplier=Farnell, ComponentLink2Description=http://www.te.com/commerce/DocumentDelivery/DDEController?Action=showdoc&DocId=Data+Sheet%7F1-1773453-6%7F0908%7Fpdf%7FEnglish%7FENG_DS_1-1773453-6_0908.pdf&src-supplier=Avnet, ComponentLink2URL=http://www.te.com/commerce/DocumentDelivery/DDEController?Action=showdoc&DocId=Data+Sheet%7F1-1773453-6%7F0908%7Fpdf%7FEnglish%7FENG_DS_1-1773453-6_0908.pdf&src-supplier=Avnet, ComponentLink3Description=http://www.te.com/commerce/DocumentDelivery/DDEController?Action=showdoc&DocId=Data+Sheet1-1773453-60908pdfEnglishENG_DS_1-1773453-6_0908.pdf&src-supplier=Avnet+Asia, ComponentLink3URL=http://www.te.com/commerce/DocumentDelivery/DDEController?Action=showdoc&DocId=Data+Sheet1-1773453-60908pdfEnglishENG_DS_1-1773453-6_0908.pdf&src-supplier=Avnet+Asia, ComponentLink4Description=https://www.te.com/commerce/DocumentDelivery/DDEController?Action=srchrtrv&DocNm=292303&DocType=Customer+Drawing&DocLang=English&src-supplier=Digi-Key, ComponentLink4URL=https://www.te.com/commerce/DocumentDelivery/DDEController?Action=srchrtrv&DocNm=292303&DocType=Customer+Drawing&DocLang=English&src-supplier=Digi-Key, ComponentLink5Description=http://www.farnell.com/datasheets/1699414.pdf?src-supplier=Element14, ComponentLink5URL=http://www.farnell.com/datasheets/1699414.pdf?src-supplier=Element14, ComponentLink6Description=http://www.farnell.com/cad/1699210.pdf?src-supplier=Element14, ComponentLink6URL=http://www.farnell.com/cad/1699210.pdf?src-supplier=Element14, ComponentLink7Description=https://www.alliedelec.com/m/d/b8ff6cd1157c72c7c4c41b4704d2a2e6.pdf?src-supplier=Allied+Electronics, ComponentLink7URL=https://www.alliedelec.com/m/d/b8ff6cd1157c72c7c4c41b4704d2a2e6.pdf?src-supplier=Allied+Electronics, ComponentLink8Description=http://www.te.com/commerce/DocumentDelivery/DDEController?Action=showdoc&DocId=Data+Sheet%7F1-1773453-6%7F0908%7Fpdf%7FEnglish%7FENG_DS_1-1773453-6_0908.pdf&src-supplier=Avnet+Europe, ComponentLink8URL=http://www.te.com/commerce/DocumentDelivery/DDEController?Action=showdoc&DocId=Data+Sheet%7F1-1773453-6%7F0908%7Fpdf%7FEnglish%7FENG_DS_1-1773453-6_0908.pdf&src-supplier=Avnet+Europe, ComponentLink9Description=https://www.distrelec.biz/Web/Downloads/07/08/04270708.pdf?mime=application%2Fpdf&src-supplier=Distrelec, ComponentLink9URL=https://www.distrelec.biz/Web/Downloads/07/08/04270708.pdf?mime=application%2Fpdf&src-supplier=Distrelec, ComponentLink10Description=http://www.jameco.com/Jameco/Products/ProdDS/921651.pdf?src-supplier=Jameco, ComponentLink10URL=http://www.jameco.com/Jameco/Products/ProdDS/921651.pdf?src-supplier=Jameco, ComponentLink11Description=http://www.onlinecomponents.com/productFiles/mf-AMP/ddecontrolleractionsrchrtrvdocnm117734536doctypedsdoclan.pdf?src-supplier=Onlinecomponents.com, ComponentLink11URL=http://www.onlinecomponents.com/productFiles/mf-AMP/ddecontrolleractionsrchrtrvdocnm117734536doctypedsdoclan.pdf?src-supplier=Onlinecomponents.com, ComponentLink12Description=http://www.te.com/commerce/DocumentDelivery/DDEController?Action=showdoc&DocId=Customer+Drawing%7F292303%7FE7%7Fpdf%7FEnglish%7FENG_CD_292303_E7.pdf%7F292303-1&src-supplier=Future+Electronics, ComponentLink12URL=http://www.te.com/commerce/DocumentDelivery/DDEController?Action=showdoc&DocId=Customer+Drawing%7F292303%7FE7%7Fpdf%7FEnglish%7FENG_CD_292303_E7.pdf%7F292303-1&src-supplier=Future+Electronics, Connector System=Cable-to-Board, Connector Type=Receptacle, Contact Material="Copper Alloy,Copper", Contact Plating=Gold, Current Rating=1A, Depth=14mm, Gender=Receptacle, Halogen Free="Halogen Free", Housing Color=Black, Housing Material=Thermoplastic, Length=14.63mm, Manufacturer Part Number=292303-1, Mount="Through Hole,Horizontal", Number of Contacts=4, Number of Ports=1, Number of Positions=4, Number of Terminals=4, Orientation="Right Angle", Packaging=Rail/Tube, PCB Thickness=0.062inch, Pitch=2.5mm, Plating=Bright,Tin, Plating Thickness=0.76um, Pricing 1="1=1.49, 10=1.354, 25=1.2716, 50=1.2162, 100=1.161, 250=1.0504, 500=0.96748, 1000=0.82926, 2500=0.77398 (USD)", REACH SVHC="No SVHC", Stock 1=19088, Supplier 1=Digi-Key, Tail Length=0.112inch, Termination="Through Hole", USB Standard="USB 2.0"
J6: "CONN HEADER SMD 6POS 2.54MM", Color=Black, Current Rating=3A, Flammability Rating="UL94 V-0", Insulation Resistance=5GR, Manufacturer="Amphenol FCI", Max Operating Temperature=125°C, Max Voltage Rating (AC)=1.5kV, Min Operating Temperature=-65°C, Package Quantity=350, Supplier Part Number 1=609-3487-6-ND, ComponentLink1Description=https://cdn.amphenol-icc.com/media/wysiwyg/files/drawing/95278.pdf?src-supplier=Digi-Key, ComponentLink1URL=https://cdn.amphenol-icc.com/media/wysiwyg/files/drawing/95278.pdf?src-supplier=Digi-Key, ComponentLink2Description=http://www.farnell.com/datasheets/1918632.pdf?src-supplier=Element14, ComponentLink2URL=http://www.farnell.com/datasheets/1918632.pdf?src-supplier=Element14, ComponentLink3Description=http://www.farnell.com/datasheets/52707.pdf?src-supplier=Element14, ComponentLink3URL=http://www.farnell.com/datasheets/52707.pdf?src-supplier=Element14, Connector Type="Male Pin", Contact Gender=Male, Contact Material=Bronze, Contact Mating Length=0.232inch, Contact Plating=Gold,GXT, Depth=4.83mm, Gender=Male, Housing Color=Black, Housing Material=Thermoplastic, Lead Free="Lead Free", Length=7.62mm, Manufacturer Part Number=95278-101A06LF, Material=Thermoplastic, Mount="Surface Mount", Number of Contacts=6, Number of Positions=6, Number of Rows=2, Orientation=Straight, Packaging="Tape and Reel", Pitch=2.54mm, Pricing 1="1=1.12, 10=0.989, 100=0.8531 (USD)", Radiation Hardening=No, REACH SVHC="No SVHC", Row Spacing=0.1inch, Stock 1=1838, Supplier 1=Digi-Key, Termination=Solder, Voltage Rating=1.5kV
J7: "USB - Micro B Female USB 2 5 SMD USB Connectors RoHS", Color=Black, Current Rating=1.8A, Flammability Rating="UL94 V-0", Insulation Resistance=1GR, Manufacturer="Amphenol FCI", Max Operating Temperature=85°C, Max Voltage Rating (AC)=100V, Min Operating Temperature=-55°C, Package Quantity=9600, Supplier Part Number 1=609-4618-1-ND, ComponentLink1Description=http://www.amphenol-icc.com/media/wysiwyg/files/drawing/10118194.pdf?src-supplier=Digi-Key, ComponentLink1URL=http://www.amphenol-icc.com/media/wysiwyg/files/drawing/10118194.pdf?src-supplier=Digi-Key, ComponentLink2Description=https://cdn.amphenol-icc.com/media/wysiwyg/files/drawing/10118194.pdf?src-supplier=Mouser, ComponentLink2URL=https://cdn.amphenol-icc.com/media/wysiwyg/files/drawing/10118194.pdf?src-supplier=Mouser, ComponentLink3Description=https://cdn.amphenol-icc.com/media/wysiwyg/files/drawing/10118194.pdf?src-supplier=Verical, ComponentLink3URL=https://cdn.amphenol-icc.com/media/wysiwyg/files/drawing/10118194.pdf?src-supplier=Verical, Connector Type=USB,Receptacle, Contact Material="Copper Alloy", Contact Plating=Gold, Depth=5mm, Features=Shielded, Gender=Receptacle, Housing Material=Polymer, Lead Free="Lead Free", Length=8.05mm, Manufacturer Part Number=10118194-0001LF, Mount="Surface Mount,Horizontal", Number of Contacts=5, Number of Ports=1, Number of Terminals=5, Orientation="Right Angle", Packaging="Tape and Reel", Pitch=0.65mm, Pricing 1="1=0.43, 10=0.405, 25=0.3648, 50=0.3242, 100=0.3107, 250=0.28368, 500=0.27016 (USD)", Radiation Hardening=No, Stock 1=35943, Supplier 1=Digi-Key, Termination=Solder
J8 J9 J10 J11 J12 J13 J15 J17: "CONN HEADER VERT 2POS 2.5MM", Color=Natural, Contact Resistance=20mR, Current Rating=3A, Housing Color=White, Manufacturer=JST, Max Operating Temperature=85°C, Max Voltage Rating (AC)=250V, Min Operating Temperature=-25°C, Supplier Part Number 1=455-1611-ND, ComponentLink1Description=http://uk.rs-online.com/webdocs/05aa/0900766b805aab1f.pdf?src-supplier=RSComponents, ComponentLink1URL=http://uk.rs-online.com/webdocs/05aa/0900766b805aab1f.pdf?src-supplier=RSComponents, ComponentLink2Description=http://www.jst-mfg.com/product/pdf/eng/eEH.pdf?src-supplier=Digi-Key, ComponentLink2URL=http://www.jst-mfg.com/product/pdf/eng/eEH.pdf?src-supplier=Digi-Key, ComponentLink3Description=https://www.verical.com/server-webapp/html/getDatasheet?partID=639961&src-supplier=Verical, ComponentLink3URL=https://www.verical.com/server-webapp/html/getDatasheet?partID=639961&src-supplier=Verical, ComponentLink4Description=http://www1.futureelectronics.com/doc/JST/B2B-EH-A(LF)(SN).pdf?src-supplier=Future+Electronics, ComponentLink4URL=http://www1.futureelectronics.com/doc/JST/B2B-EH-A(LF)(SN).pdf?src-supplier=Future+Electronics, ComponentLink5Description=http://www.produktinfo.conrad.com/datenblaetter/1200000-1299999/001217319-da-01-en-STIFTLEISTE_GERADE_2_POL__RM_25MM.pdf?src-supplier=Conrad, ComponentLink5URL=http://www.produktinfo.conrad.com/datenblaetter/1200000-1299999/001217319-da-01-en-STIFTLEISTE_GERADE_2_POL__RM_25MM.pdf?src-supplier=Conrad, Connector Type="Male Pin,Plug", Contact Material="Copper Alloy,Brass", Contact Mating Length=0.13inch, Contact Plating=Tin,Copper, Depth=3.8mm, Fastening Type=Detent, Gender=Male, Housing Material=Nylon, Lead Free="Lead Free", Length=7.5mm, Manufacturer Part Number=B2B-EH-A(LF)(SN), Max Current Rating=3A, Mount="Through Hole", Number of Contacts=2, Number of Positions=2, Number of Rows=1, Orientation=Straight, Packaging=Bulk, Pitch=2.5mm, Pricing 1="1=0.14, 10=0.131, 100=0.0809, 500=0.06698, 1000=0.05861, 5000=0.05024, 10000=0.04884 (USD)", Stock 1=25023, Supplier 1=Digi-Key, Termination=Press-Fit, Voltage Rating=250V
P1: "P=5.0mm Screw terminal RoHS", Manufacturer="Ningbo Kangnex Elec", Package=Custom, Manufacturer Part No=WJ301V-5.0-2P
Q1 Q2 Q3 Q4: "MOSFET N-CH 60V 100A 8VSON", Continuous Drain Current (ID)=100A, Drain to Source Voltage (Vdss)=60V, Gate to Source Voltage (Vgs)=20V, Input Capacitance=4.23nF, Manufacturer="Texas Instruments", Max Operating Temperature=150°C, Max Power Dissipation=3.1W, Min Operating Temperature=-55°C, Supplier Part Number 1=296-41076-1-ND, ComponentLink1Description=http://www.ti.com/lit/gpn/csd18540q5b?src-supplier=Mouser, ComponentLink1URL=http://www.ti.com/lit/gpn/csd18540q5b?src-supplier=Mouser, ComponentLink2Description=http://www.ti.com/general/docs/lit/getliterature.tsp?genericPartNumber=CSD18540Q5B&amp;&amp;fileType=pdf&src-supplier=Avnet+Asia, ComponentLink2URL=http://www.ti.com/general/docs/lit/getliterature.tsp?genericPartNumber=CSD18540Q5B&amp;&amp;fileType=pdf&src-supplier=Avnet+Asia, ComponentLink3Description=http://www.ti.com/general/docs/lit/getliterature.tsp?genericPartNumber=CSD18540Q5B&&fileType=pdf&src-supplier=Avnet, ComponentLink3URL=http://www.ti.com/general/docs/lit/getliterature.tsp?genericPartNumber=CSD18540Q5B&&fileType=pdf&src-supplier=Avnet, ComponentLink4Description=http://www.ti.com/lit/ds/symlink/csd18540q5b.pdf?src-supplier=Digi-Key, ComponentLink4URL=http://www.ti.com/lit/ds/symlink/csd18540q5b.pdf?src-supplier=Digi-Key, Contact Plating=Gold, Element Configuration=Single, Fall Time=3ns, Lead Free="Contains Lead", Manufacturer Part Number=CSD18540Q5B, Mount="Surface Mount", Number of Pins=8, Packaging="Tape and Reel", Pricing 1="1=2.44, 10=2.189, 25=2.0652, 100=1.6107, 250=1.5694, 500=1.3629, 1000=1.1564 (USD)", Rds On Max=2.2mR, Rise Time=9ns, Stock 1=0, Supplier 1=Digi-Key, Turn-Off Delay Time=20ns, Turn-On Delay Time=6ns
Q5: "TRANS PNP 100V 3A DPAK"
Q6: "TRANS NPN 100V 3A DPAK", Case/Package=DPAK, Collector Base Voltage (VCBO)=100V, Collector Emitter Saturation Voltage=1.2V, Current Rating=3A, Emitter Base Voltage (VEBO)=5V, Frequency=3MHz, Manufacturer="ON Semiconductor", Max Operating Temperature=150°C, Max Power Dissipation=1.56W, Min Operating Temperature=-65°C, Package Quantity=1, Supplier Part Number 1=MJD31CT4GOSDKR-ND, Collector Emitter Breakdown Voltage=100V, Collector Emitter Voltage (VCEO)=100V, ComponentLink1Description=http://www.onsemi.com/pub/Collateral/MJD31-D.PDF?src-supplier=Digi-Key, ComponentLink1URL=http://www.onsemi.com/pub/Collateral/MJD31-D.PDF?src-supplier=Digi-Key, ComponentLink2Description=http://www.onsemi.com/pub/Collateral/MJD31-D.PDF?src-supplier=Avnet, ComponentLink2URL=http://www.onsemi.com/pub/Collateral/MJD31-D.PDF?src-supplier=Avnet, ComponentLink3Description=http://www.onsemi.com/pub/Collateral/MJD31-D.PDF?src-supplier=Element14, ComponentLink3URL=http://www.onsemi.com/pub/Collateral/MJD31-D.PDF?src-supplier=Element14, ComponentLink4Description=http://www.mouser.com/ds/2/308/MJD31-D-90514.pdf?src-supplier=Mouser, ComponentLink4URL=http://www.mouser.com/ds/2/308/MJD31-D-90514.pdf?src-supplier=Mouser, ComponentLink5Description=http://www.jameco.com/Jameco/Products/ProdDS/1055943.pdf?src-supplier=Jameco, ComponentLink5URL=http://www.jameco.com/Jameco/Products/ProdDS/1055943.pdf?src-supplier=Jameco, ComponentLink6Description=http://www.onsemi.com/pub_link/Collateral/MJD31-D.PDF?src-supplier=Element14, ComponentLink6URL=http://www.onsemi.com/pub_link/Collateral/MJD31-D.PDF?src-supplier=Element14, ComponentLink7Description=http://www.onsemi.com/pub/Collateral/MJD31-D.PDF?src-supplier=Future+Electronics, ComponentLink7URL=http://www.onsemi.com/pub/Collateral/MJD31-D.PDF?src-supplier=Future+Electronics, Contact Plating=Tin,Matte, Element Configuration=Single, Gain Bandwidth Product=3MHz, Height=2.38mm, hFE Min=25, Lead Free="Lead Free", Length=6.73mm, Manufacturer Part Number=MJD31CT4G, Max Breakdown Voltage=100V, Max Collector Current=3A, Max Frequency=3MHz, Number of Elements=1, Number of Pins=3, Packaging="Tape and Reel", Polarity=NPN, Power Dissipation=1.56W, Pricing 1="1=0.5, 10=0.427, 25=0.3988, 100=0.2961, 250=0.28132, 500=0.23122, 1000=0.18794 (USD)", Radiation Hardening=No, REACH SVHC="No SVHC", Stock 1=48908, Supplier 1=Digi-Key, Transition Frequency=3MHz, Voltage Rating (DC)=100V, Width=6.22mm
Q7 Q8 Q9 Q10 Q11 Q12 Q13 Q14: "MOSFET P-CHA 60V 720MW SOT23", Case/Package=TO-236-3, Continuous Drain Current (ID)=1.5A, Drain to Source Voltage (Vdss)=60V, Input Capacitance=206pF, Manufacturer=Diodes, Max Operating Temperature=150°C, Max Power Dissipation=720mW, Min Operating Temperature=-55°C, Supplier Part Number 1=DMP6350S-7DICT-ND, ComponentLink1Description=http://www.farnell.com/datasheets/2814435.pdf?src-supplier=Newark, ComponentLink1URL=http://www.farnell.com/datasheets/2814435.pdf?src-supplier=Newark, ComponentLink2Description=http://www.farnell.com/datasheets/2814435.pdf?src-supplier=Farnell, ComponentLink2URL=http://www.farnell.com/datasheets/2814435.pdf?src-supplier=Farnell, ComponentLink3Description=https://www.diodes.com/assets/Datasheets/DMP6350S.pdf?src-supplier=Digi-Key, ComponentLink3URL=https://www.diodes.com/assets/Datasheets/DMP6350S.pdf?src-supplier=Digi-Key, ComponentLink4Description=http://www.farnell.com/datasheets/2814435.pdf?src-supplier=Element14, ComponentLink4URL=http://www.farnell.com/datasheets/2814435.pdf?src-supplier=Element14, Manufacturer Part Number=DMP6350S-7, Mount="Surface Mount", Packaging="Tape and Reel", Pricing 1="1=0.41, 10=0.355, 25=0.3316, 100=0.2463, 500=0.19232, 1000=0.15632 (USD)", Rds On Max=350mR, Stock 1=30890, Supplier 1=Digi-Key
R2: library part RC0402FR-0722K6L, "RES SMD 22.6K OHM 1% 1/16W 0402", Case/Package=0402, Case Code (Metric)=1005, Manufacturer=Yageo, Max Operating Temperature=155°C, Max Power Dissipation=63mW, Min Operating Temperature=-55°C, Power Rating=62.5mW, Resistance=22.6kR, Supplier Part Number 1=YAG3061CT-ND, Temperature Coefficient=100ppm/°C, Tolerance=1%, Voltage Rating=50V, Case Code (Imperial)=0402, ComponentLink1Description=http://www.yageo.com/pdf/PYu-RC0402_51_RoHS_L_4.pdf?src-supplier=Avnet, ComponentLink1URL=http://www.yageo.com/pdf/PYu-RC0402_51_RoHS_L_4.pdf?src-supplier=Avnet, ComponentLink2Description=http://www.yageo.com/documents/recent/PYu-RC0402_51_RoHS_L_6_r.pdf?src-supplier=Mouser, ComponentLink2URL=http://www.yageo.com/documents/recent/PYu-RC0402_51_RoHS_L_6_r.pdf?src-supplier=Mouser, ComponentLink3Description=http://www.yageo.com/documents/recent/PYu-RC0402_51_RoHS_L_6.pdf?src-supplier=Avnet+Europe, ComponentLink3URL=http://www.yageo.com/documents/recent/PYu-RC0402_51_RoHS_L_6.pdf?src-supplier=Avnet+Europe, Composition="Thick Film", Contact Plating=Tin,Matte,Lead, Depth=0.5mm, Features="Moisture Resistant", Height=0.016inch, Lead Free="Lead Free", Length=1mm, Manufacturer Part Number=RC0402FR-0722K6L, Military Standard=Not, Number of Terminations=2, Packaging="Tape and Reel", Pricing 1="1=0.1, 10=0.016, 100=0.0064, 1000=0.00289, 2500=0.00251, 5000=0.00207 (USD)", Radiation Hardening=No, Stock 1=3082, Supplier 1=Digi-Key, Termination=SMD/SMT, Voltage Rating (DC)=50V, Width=0.02inch
R3 R37: library part ERJ-2RKF4702X, "RES SMD 47K OHM 1% 1/10W 0402", Case/Package=0402, Case Code (Metric)=1005, Manufacturer=Panasonic, Max Operating Temperature=155°C, Max Power Dissipation=100mW, Min Operating Temperature=-55°C, Package Quantity=1, Resistance=47kR, Supplier Part Number 1=P47.0KLCT-ND, Temperature Coefficient=100ppm/°C, Tolerance=1%, Voltage Rating=50V, Case Code (Imperial)=0402, ComponentLink1Description=http://www.farnell.com/datasheets/1911175.pdf?src-supplier=Element14, ComponentLink1URL=http://www.farnell.com/datasheets/1911175.pdf?src-supplier=Element14, ComponentLink2Description=http://industrial.panasonic.com/www-data/pdf/AOA0000/AOA0000CE2.pdf?src-supplier=Avnet, ComponentLink2URL=http://industrial.panasonic.com/www-data/pdf/AOA0000/AOA0000CE2.pdf?src-supplier=Avnet, ComponentLink3Description=http://industrial.panasonic.com/www-data/pdf/AOA0000/AOA0000CE2.pdf?src-supplier=Avnet+Asia, ComponentLink3URL=http://industrial.panasonic.com/www-data/pdf/AOA0000/AOA0000CE2.pdf?src-supplier=Avnet+Asia, ComponentLink4Description=http://www.farnell.com/datasheets/1678782.pdf?src-supplier=Element14, ComponentLink4URL=http://www.farnell.com/datasheets/1678782.pdf?src-supplier=Element14, ComponentLink5Description=http://industrial.panasonic.com/www-data/pdf/AOA0000/AOA0000CE2.pdf?src-supplier=Element14, ComponentLink5URL=http://industrial.panasonic.com/www-data/pdf/AOA0000/AOA0000CE2.pdf?src-supplier=Element14, ComponentLink6Description=https://www.alliedelec.com/m/d/623f45ff1957d936ff56d46fd1c28cac.pdf?src-supplier=Allied+Electronics, ComponentLink6URL=https://www.alliedelec.com/m/d/623f45ff1957d936ff56d46fd1c28cac.pdf?src-supplier=Allied+Electronics, ComponentLink7Description=http://industrial.panasonic.com/cdbs/www-data/pdf/RDA0000/AOA0000C304.pdf?src-supplier=Farnell, ComponentLink7URL=http://industrial.panasonic.com/cdbs/www-data/pdf/RDA0000/AOA0000C304.pdf?src-supplier=Farnell, Composition="Thick Film", Contact Plating=Tin, Depth=0.5mm, Features="Automotive AEC-Q200", Height=0.35mm, Lead Free="Lead Free", Length=1mm, Manufacturer Part Number=ERJ-2RKF4702X, Military Standard=Not, Mount="Surface Mount", Number of Pins=2, Number of Terminations=2, Packaging="Tape and Reel", Power Rating=100mW, Pricing 1="1=0.1, 10=0.045, 100=0.0183, 1000=0.00822, 2500=0.00713, 5000=0.00589 (USD)", Radiation Hardening=No, REACH SVHC="No SVHC", Stock 1=1741209, Supplier 1=Digi-Key, Termination=SMD/SMT, Voltage Rating (DC)=50V, Width=0.5mm
R4 R5 R17 R28 R29 R31 R33 R36 R38 R44 RM1 RM2: library part RC0201JR-0710KL, "RES SMD 10K OHM 5% 1/20W 0201", Case/Package=0201, Case Code (Metric)=0603, Manufacturer=Yageo, Max Operating Temperature=125°C, Min Operating Temperature=-55°C, Power Rating=50mW, Resistance=10kR, Supplier Part Number 1=311-10KNDKR-ND, Temperature Coefficient=200ppm/°C, Tolerance=5%, Voltage Rating=25V, Case Code (Imperial)=0201, ComponentLink1Description=http://www.farnell.com/datasheets/2167052.pdf?src-supplier=Element14, ComponentLink1URL=http://www.farnell.com/datasheets/2167052.pdf?src-supplier=Element14, ComponentLink2Description=http://www.yageo.com/documents/recent/PYu-RC0201_51_RoHS_L_8.pdf?src-supplier=Avnet+Europe, ComponentLink2URL=http://www.yageo.com/documents/recent/PYu-RC0201_51_RoHS_L_8.pdf?src-supplier=Avnet+Europe, ComponentLink3Description=http://www.yageo.com/documents/recent/PYu-RC0201_51_RoHS_L_8.pdf?src-supplier=Avnet, ComponentLink3URL=http://www.yageo.com/documents/recent/PYu-RC0201_51_RoHS_L_8.pdf?src-supplier=Avnet, Composition="Thick Film", Contact Plating=Tin,Matte, Depth=0.3mm, Lead Free="Lead Free", Length=0.6mm, Manufacturer Part Number=RC0201JR-0710KL, Military Standard=Not, Packaging="Tape and Reel", Pricing 1="1=0.1, 10=0.028, 100=0.0115, 1000=0.00517, 2500=0.00448, 5000=0.00371 (USD)", Radiation Hardening=No, REACH SVHC=Unknown, Stock 1=1378070, Supplier 1=Digi-Key, Termination=SMD/SMT, Voltage Rating (DC)=25V
R6 RM3: library part RC0603FR-0768KL, "RES SMD 68K OHM 1% 1/10W 0603", Case/Package=0603, Case Code (Metric)=1608, Manufacturer=Yageo, Max Operating Temperature=155°C, Max Power Dissipation=100mW, Min Operating Temperature=-55°C, Package Quantity=1, Resistance=68kR, Supplier Part Number 1=311-68.0KHRDKR-ND, Temperature Coefficient=100ppm/°C, Tolerance=1%, Voltage Rating=50V, Case Code (Imperial)=0603, ComponentLink1Description=http://www.yageo.com/documents/recent/PYu-RC_Group_51_RoHS_L_10.pdf?src-supplier=Digi-Key, ComponentLink1URL=http://www.yageo.com/documents/recent/PYu-RC_Group_51_RoHS_L_10.pdf?src-supplier=Digi-Key, ComponentLink2Description=http://documents.rs-components.com/techlib://itc_doclist_GB.htm?stockno=5048243&src-supplier=RSComponents, ComponentLink2URL=http://documents.rs-components.com/techlib://itc_doclist_GB.htm?stockno=5048243&src-supplier=RSComponents, ComponentLink3Description=http://www.yageo.com/documents/recent/PYu-RC_Group_51_RoHS_L_9.pdf?src-supplier=Digi-Key, ComponentLink3URL=http://www.yageo.com/documents/recent/PYu-RC_Group_51_RoHS_L_9.pdf?src-supplier=Digi-Key, ComponentLink4Description=http://www.farnell.com/datasheets/1868787.pdf?src-supplier=Element14, ComponentLink4URL=http://www.farnell.com/datasheets/1868787.pdf?src-supplier=Element14, ComponentLink5Description=http://www.farnell.com/datasheets/443971.pdf?src-supplier=Element14, ComponentLink5URL=http://www.farnell.com/datasheets/443971.pdf?src-supplier=Element14, ComponentLink6Description=http://www.farnell.com/datasheets/2167052.pdf?src-supplier=Element14, ComponentLink6URL=http://www.farnell.com/datasheets/2167052.pdf?src-supplier=Element14, Composition="Thick Film", Depth=0.8mm, Features="Moisture Resistant", Height=0.022inch, Lead Free="Lead Free", Length=0.063inch, Manufacturer Part Number=RC0603FR-0768KL, Number of Pins=2, Number of Terminations=2, Packaging="Tape and Reel", Power Rating=100mW, Pricing 1="1=0.1, 10=0.023, 100=0.0094, 1000=0.00421, 2500=0.00366 (USD)", REACH SVHC=Unknown, Stock 1=2780416, Supplier 1=Digi-Key, Termination=SMD/SMT, Voltage Rating (DC)=50V, Width=0.031inch